# Altium PCB Electrode_Ribbon_PCB_v3.1.PcbDoc (part 4 of 5)
Units mil, origin at the board's own origin, x right, y up, seen from the top; angles counter-clockwise.
Board outline 8303.83 x 5482.84 mil, 2 copper layers (Top Layer, Bottom Layer), stack 3.556 mil thick; 265 components, 171 nets, 720 pads, 346 vias.
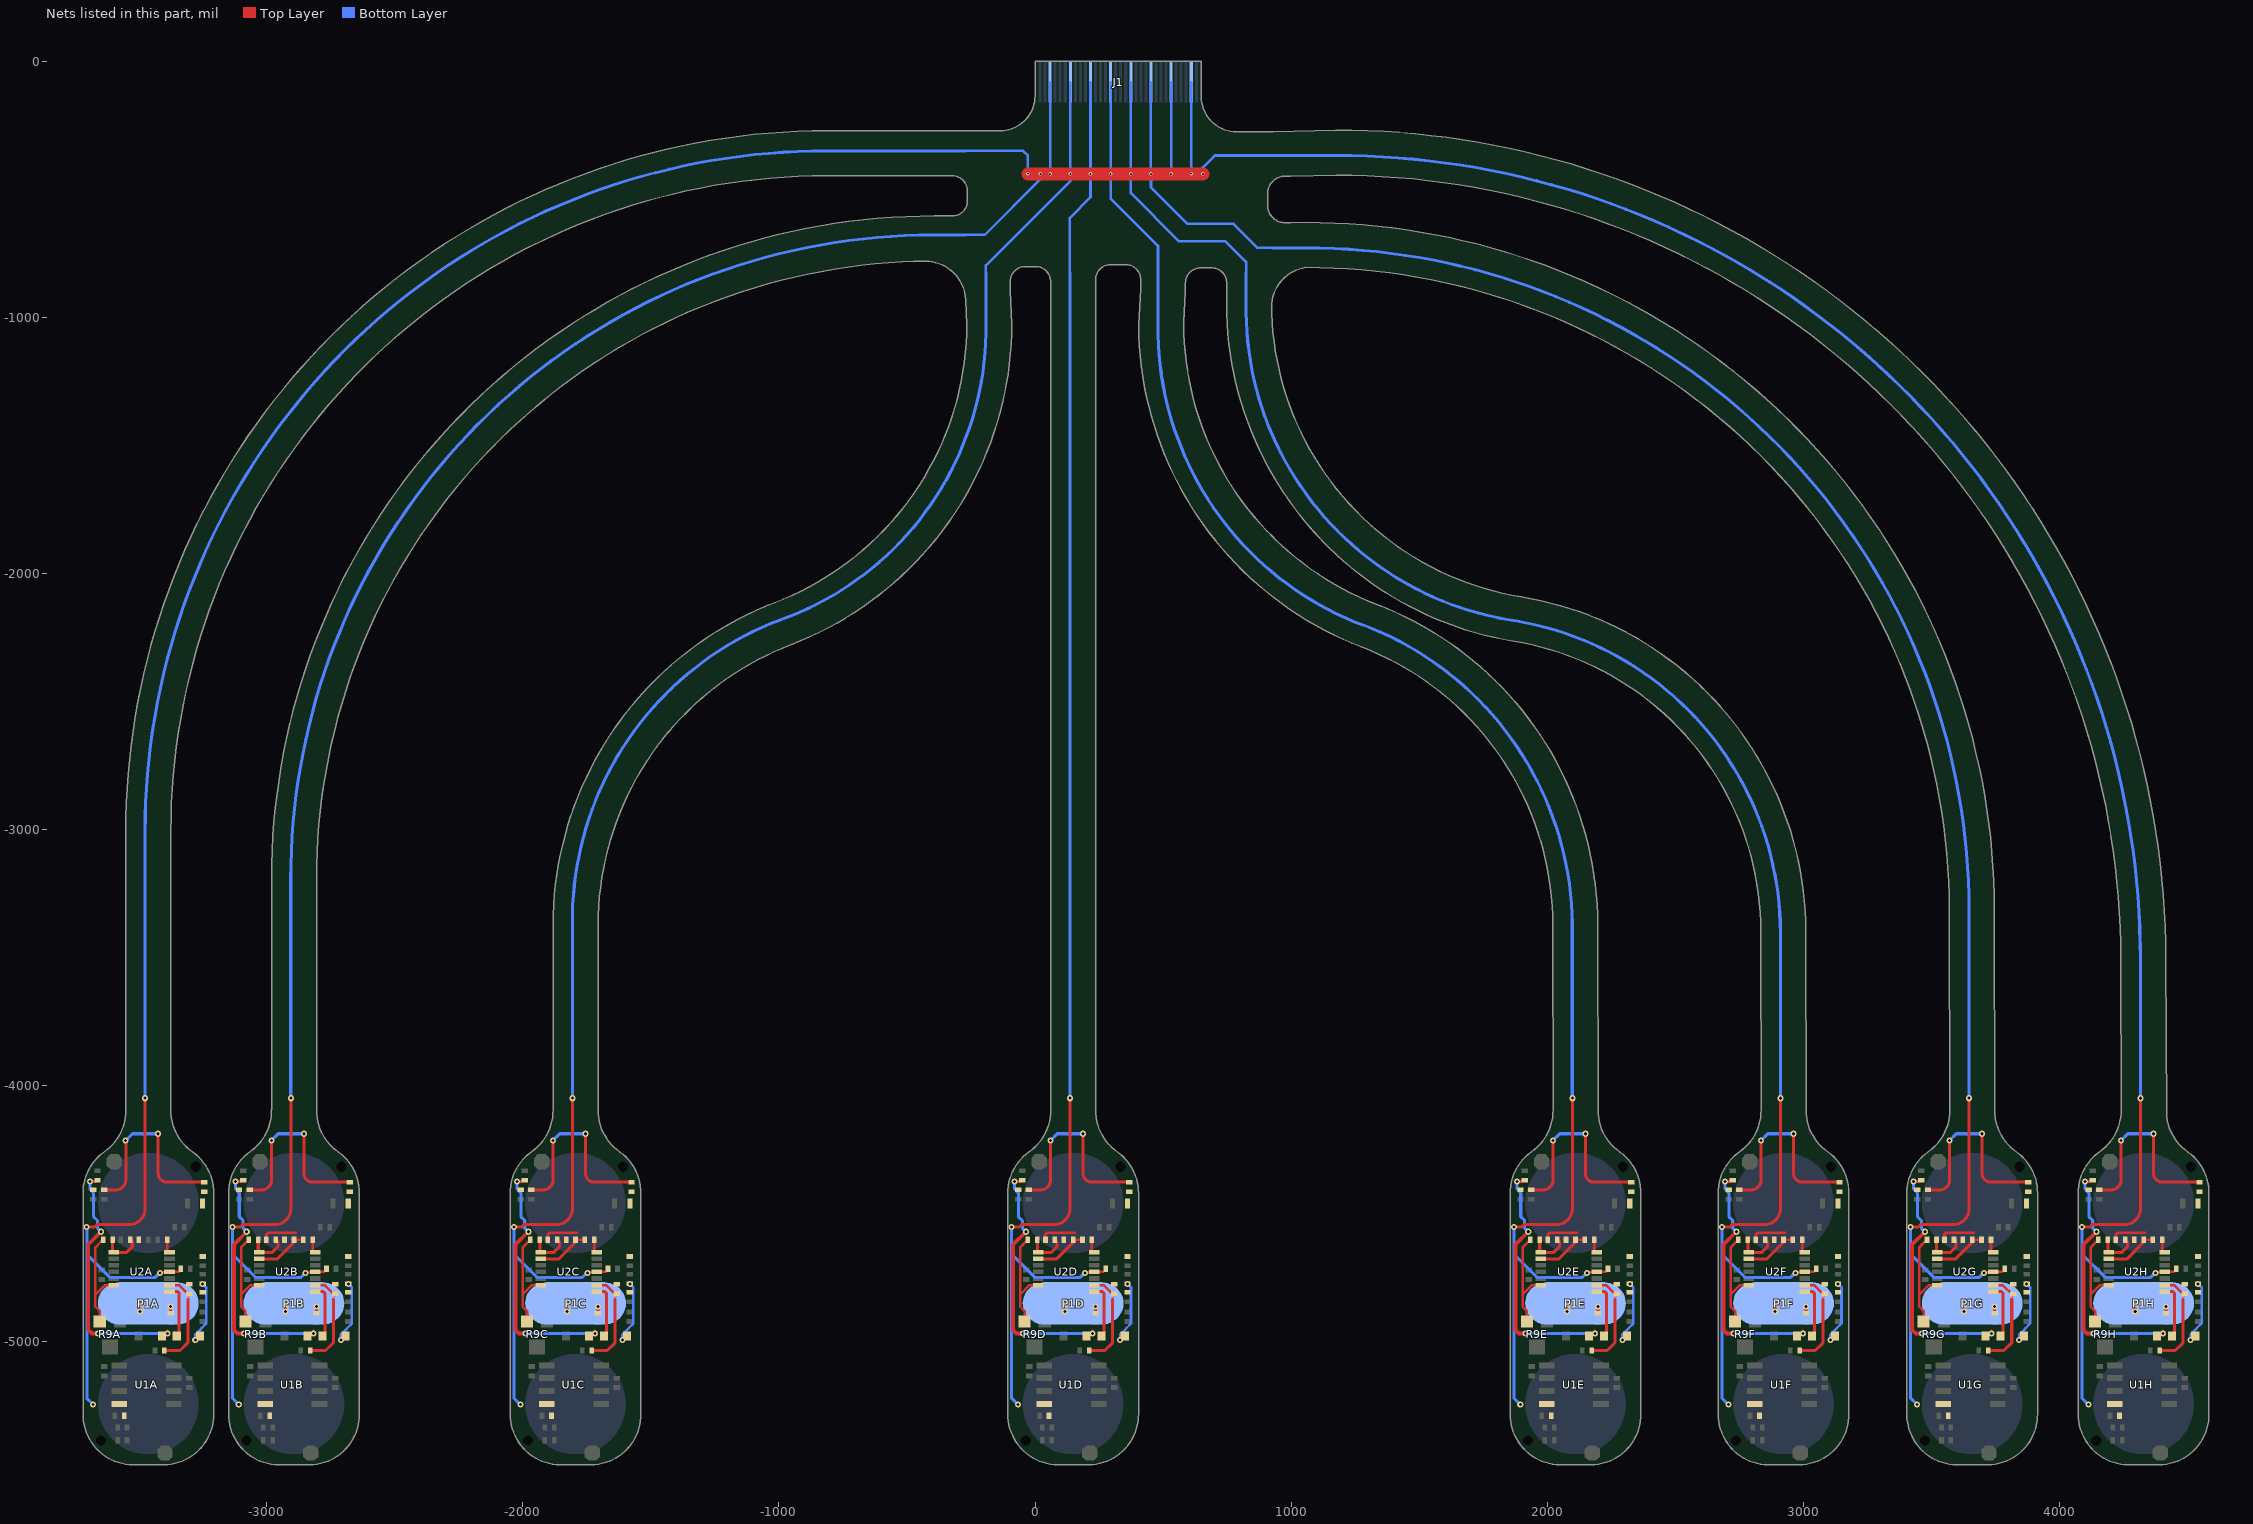
[diagram p3: the nets of this part, all layers, seen from the top]

## Via types
v1: diameter 23.62, hole 11.81, Top Layer to Bottom Layer, tented both sides, 304 vias
v2: diameter 13.78, hole 7.87, Top Layer to Bottom Layer, 42 vias

## Nets (pads, with @x,y where several pads share a name; then routed paths per layer and width w, separated by ;. In a path a pad name is that pad's centre, name@x,y a point inside that pad or via, vN(x,y) a via of type N, cw(c..) or ccw(c..) an arc to the next point about the centre after c; other vN are vias at no path point) (continued)
NetC4B_2: C4B.2 R7B.1 R8B.1 U2B.9 | length 353.4
  Top Layer w10: C4B.2@-2998.4,-4599.78 C4B.2@-3002.4,-4603.78 -3002.4,-4582.64 -2996.54,-4576.78 -2887.9,-4576.78 ; R7B.1@-2897.9,-4608.28 R7B.1@-2894.4,-4604.78 R7B.1@-2894.4,-4614.26 ; R7B.1@-2890.9,-4611.78 -2883.9,-4604.78 R8B.1@-2861.9,-4604.78
  Top Layer w12: U2B.9@-3031.13,-4678.6 -2958.74,-4678.6 R7B.1@-2894.4,-4614.26
NetC4C_2: C4C.2 R7C.1 R8C.1 U2C.9 | length 353.4
  Top Layer w10: C4C.2@-1898.61,-4599.78 C4C.2@-1902.61,-4603.78 -1902.61,-4582.64 -1896.76,-4576.78 -1788.11,-4576.78 ; R7C.1@-1798.11,-4608.28 R7C.1@-1794.61,-4604.78 R7C.1@-1794.61,-4614.26 ; R7C.1@-1791.11,-4611.78 -1784.11,-4604.78 R8C.1@-1762.11,-4604.78
  Top Layer w12: U2C.9@-1931.35,-4678.6 -1858.95,-4678.6 R7C.1@-1794.61,-4614.26
NetC4D_2: C4D.2 R7D.1 R8D.1 U2D.9 | length 353.4
  Top Layer w10: C4D.2@44.87,-4599.78 C4D.2@40.87,-4603.78 40.87,-4582.64 46.73,-4576.78 155.37,-4576.78 ; R7D.1@145.37,-4608.28 R7D.1@148.87,-4604.78 R7D.1@148.87,-4614.26 ; R7D.1@152.37,-4611.78 159.37,-4604.78 R8D.1@181.37,-4604.78
  Top Layer w12: U2D.9@12.13,-4678.6 84.53,-4678.6 R7D.1@148.87,-4614.26
NetC4E_2: C4E.2 R7E.1 R8E.1 U2E.9 | length 353.4
  Top Layer w10: C4E.2@2007.04,-4599.78 C4E.2@2003.04,-4603.78 2003.04,-4582.64 2008.89,-4576.78 2117.54,-4576.78 ; R7E.1@2107.54,-4608.28 R7E.1@2111.04,-4604.78 R7E.1@2111.04,-4614.26 ; R7E.1@2114.54,-4611.78 2121.54,-4604.78 R8E.1@2143.54,-4604.78
  Top Layer w12: U2E.9@1974.3,-4678.6 2046.7,-4678.6 R7E.1@2111.04,-4614.26
NetC4F_2: C4F.2 R7F.1 R8F.1 U2F.9 | length 353.4
  Top Layer w10: C4F.2@2819.75,-4599.79 C4F.2@2815.75,-4603.79 2815.75,-4582.65 2821.61,-4576.79 2930.25,-4576.79 ; R7F.1@2920.25,-4608.29 R7F.1@2923.75,-4604.79 R7F.1@2923.75,-4614.27 ; R7F.1@2927.25,-4611.79 2934.25,-4604.79 R8F.1@2956.25,-4604.79
  Top Layer w12: U2F.9@2787.01,-4678.61 2859.41,-4678.61 R7F.1@2923.75,-4614.27
NetC4G_2: C4G.2 R7G.1 R8G.1 U2G.9 | length 353.4
  Top Layer w10: C4G.2@3556.5,-4599.78 C4G.2@3552.5,-4603.78 3552.5,-4582.64 3558.36,-4576.78 3667,-4576.78 ; R7G.1@3657,-4608.28 R7G.1@3660.5,-4604.78 R7G.1@3660.5,-4614.26 ; R7G.1@3664,-4611.78 3671,-4604.78 R8G.1@3693,-4604.78
  Top Layer w12: U2G.9@3523.76,-4678.6 3596.16,-4678.6 R7G.1@3660.5,-4614.26
NetC4H_2: C4H.2 R7H.1 R8H.1 U2H.9 | length 353.4
  Top Layer w10: C4H.2@4225.97,-4599.78 C4H.2@4221.97,-4603.78 4221.97,-4582.64 4227.83,-4576.78 4336.47,-4576.78 ; R7H.1@4326.47,-4608.28 R7H.1@4329.97,-4604.78 R7H.1@4329.97,-4614.26 ; R7H.1@4333.47,-4611.78 4340.47,-4604.78 R8H.1@4362.47,-4604.78
  Top Layer w12: U2H.9@4193.24,-4678.6 4265.63,-4678.6 R7H.1@4329.97,-4614.26
NetD1A_2: D1A.2 R2A.2 R3A.2 | length 268.4
  Top Layer w10: v1(-3279.89,-4995.78) -3277.61,-4993.5 -3272.37,-4993.5 -3261.62,-4982.75 D1A.2@-3261.62,-4980.78
  Bottom Layer w10: v1(-3279.89,-4995.78) -3279.89,-4974.16 -3255.81,-4950.08 -3255.81,-4949.7 -3237.26,-4931.15 -3237.26,-4789.9 v1(-3250.87,-4776.28)
NetD1B_2: D1B.2 R2B.2 R3B.2 | length 268.4
  Top Layer w10: v1(-2710.92,-4995.78) -2708.63,-4993.5 -2703.39,-4993.5 -2692.64,-4982.75 D1B.2@-2692.64,-4980.78
  Bottom Layer w10: v1(-2710.92,-4995.78) -2710.92,-4974.16 -2686.84,-4950.08 -2686.84,-4949.7 -2668.28,-4931.15 -2668.28,-4789.9 v1(-2681.9,-4776.28)
NetD1C_2: D1C.2 R2C.2 R3C.2 | length 268.4
  Top Layer w10: v1(-1611.13,-4995.78) -1608.85,-4993.5 -1603.61,-4993.5 -1592.86,-4982.75 D1C.2@-1592.86,-4980.78
  Bottom Layer w10: v1(-1611.13,-4995.78) -1611.13,-4974.16 -1587.05,-4950.08 -1587.05,-4949.7 -1568.58,-4931.23 -1568.58,-4789.82 v1(-1582.11,-4776.28)
NetD1D_2: D1D.2 R2D.2 R3D.2 | length 268.4
  Top Layer w10: v1(332.35,-4995.78) 334.63,-4993.5 339.88,-4993.5 350.63,-4982.75 D1D.2@350.63,-4980.78
  Bottom Layer w10: v1(332.35,-4995.78) 332.35,-4974.16 356.43,-4950.08 356.43,-4949.7 374.99,-4931.15 374.99,-4789.9 v1(361.37,-4776.28)
NetD1E_2: D1E.2 R2E.2 R3E.2 | length 268.7
  Top Layer w10: v1(2294.52,-4995.78) 2296.8,-4993.5 2302.04,-4993.5 2312.79,-4982.75 D1E.2@2312.79,-4980.78
  Bottom Layer w10: v1(2294.52,-4995.78) 2294.52,-4974.16 2318.6,-4950.08 2318.6,-4949.7 2337.47,-4930.83 2337.47,-4790.22 v1(2323.54,-4776.28)
NetD1F_2: D1F.2 R2F.2 R3F.2 | length 268.7
  Top Layer w10: v1(3107.23,-4995.79) 3109.51,-4993.51 3114.76,-4993.51 3125.5,-4982.76 D1F.2@3125.5,-4980.79
  Bottom Layer w10: v1(3107.23,-4995.79) 3107.23,-4974.16 3131.31,-4950.08 3131.31,-4949.71 3150.18,-4930.83 3150.18,-4790.23 v1(3136.25,-4776.29)
NetD1G_2: D1G.2 R2G.2 R3G.2 | length 268.7
  Top Layer w10: v1(3843.98,-4995.78) 3846.26,-4993.5 3851.5,-4993.5 3862.25,-4982.75 D1G.2@3862.25,-4980.78
  Bottom Layer w10: v1(3843.98,-4995.78) 3843.98,-4974.16 3868.06,-4950.08 3868.06,-4949.7 3886.93,-4930.83 3886.93,-4790.22 v1(3873,-4776.28)
NetD1H_2: D1H.2 R2H.2 R3H.2 | length 268.7
  Top Layer w10: v1(4513.45,-4995.78) 4515.74,-4993.5 4520.98,-4993.5 4531.73,-4982.75 D1H.2@4531.73,-4980.78
  Bottom Layer w10: v1(4513.45,-4995.78) 4513.45,-4974.16 4537.53,-4950.08 4537.53,-4949.7 4556.41,-4930.83 4556.41,-4790.22 v1(4542.47,-4776.28)
NetLED1A_2: LED1A.2 R11A.2
NetLED1B_2: LED1B.2 R11B.2
NetLED1C_2: LED1C.2 R11C.2
NetLED1D_2: LED1D.2 R11D.2
NetLED1E_2: LED1E.2 R11E.2
NetLED1F_2: LED1F.2 R11F.2
NetLED1G_2: LED1G.2 R11G.2
NetLED1H_2: LED1H.2 R11H.2
NetP1A_3: P1A.3 SB3A.1 SB4A.1 | length 53
  Top Layer w12: v1(-3495.89,-4884.78) SB4A.1@-3495.89,-4858.28 ; SB3A.1@-3375.89,-4891.28 v1(-3375.89,-4864.78)
NetP1B_3: P1B.3 SB3B.1 SB4B.1 | length 53
  Top Layer w12: v1(-2926.92,-4884.78) SB4B.1@-2926.92,-4858.28 ; SB3B.1@-2806.92,-4891.28 v1(-2806.92,-4864.78)
NetP1C_3: P1C.3 SB3C.1 SB4C.1 | length 53
  Top Layer w12: v1(-1827.13,-4884.78) SB4C.1@-1827.13,-4858.28 ; SB3C.1@-1707.13,-4891.28 v1(-1707.13,-4864.78)
NetP1D_3: P1D.3 SB3D.1 SB4D.1 | length 53
  Top Layer w12: v1(116.35,-4884.78) SB4D.1@116.35,-4858.28 ; SB3D.1@236.35,-4891.28 v1(236.35,-4864.78)
NetP1E_3: P1E.3 SB3E.1 SB4E.1 | length 53
  Top Layer w12: v1(2078.52,-4884.78) SB4E.1@2078.52,-4858.28 ; SB3E.1@2198.52,-4891.28 v1(2198.52,-4864.78)
NetP1F_3: P1F.3 SB3F.1 SB4F.1 | length 53
  Top Layer w12: v1(2891.23,-4884.79) SB4F.1@2891.23,-4858.29 ; SB3F.1@3011.23,-4891.29 v1(3011.23,-4864.79)
NetP1G_3: P1G.3 SB3G.1 SB4G.1 | length 53
  Top Layer w12: v1(3627.98,-4884.78) SB4G.1@3627.98,-4858.28 ; SB3G.1@3747.98,-4891.28 v1(3747.98,-4864.78)
NetP1H_3: P1H.3 SB3H.1 SB4H.1 | length 53
  Top Layer w12: v1(4297.45,-4884.78) SB4H.1@4297.45,-4858.28 ; SB3H.1@4417.45,-4891.28 v1(4417.45,-4864.78)
NetR3A_1: R3A.1 R4A.1 R5A.1 U2A.2 | length 366.6
  Top Layer w10: U2A.2@-3380.62,-4780.97 U2A.2@-3379.64,-4780.97 ; U2A.2@-3379.55,-4780.87 U2A.2@-3379.64,-4780.97 ; R3A.1@-3304.81,-4820.23 -3344.07,-4780.97 U2A.2@-3379.64,-4780.97
  Top Layer w12: R5A.1@-3400.39,-5036.78 -3339.87,-5036.78 -3308.87,-5005.78 -3308.87,-4835.78
NetR3B_1: R3B.1 R4B.1 R5B.1 U2B.2 | length 366.6
  Top Layer w10: U2B.2@-2811.64,-4780.96 U2B.2@-2810.66,-4780.96 ; U2B.2@-2810.57,-4780.87 U2B.2@-2810.66,-4780.96 ; R3B.1@-2735.84,-4820.22 -2775.1,-4780.96 U2B.2@-2810.66,-4780.96
  Top Layer w12: R5B.1@-2831.42,-5036.78 -2770.9,-5036.78 -2739.9,-5005.78 -2739.9,-4835.78
NetR3C_1: R3C.1 R4C.1 R5C.1 U2C.2 | length 366.6
  Top Layer w10: U2C.2@-1711.86,-4780.97 U2C.2@-1710.88,-4780.97 ; U2C.2@-1710.79,-4780.87 U2C.2@-1710.88,-4780.97 ; R3C.1@-1636.05,-4820.23 -1675.31,-4780.97 U2C.2@-1710.88,-4780.97
  Top Layer w12: R5C.1@-1731.63,-5036.78 -1671.11,-5036.78 -1640.11,-5005.78 -1640.11,-4835.78
NetR3D_1: R3D.1 R4D.1 R5D.1 U2D.2 | length 366.6
  Top Layer w10: U2D.2@231.62,-4780.96 U2D.2@232.61,-4780.96 ; U2D.2@232.7,-4780.87 U2D.2@232.61,-4780.96 ; R3D.1@307.43,-4820.22 268.17,-4780.96 U2D.2@232.61,-4780.96
  Top Layer w12: R5D.1@211.85,-5036.78 272.37,-5036.78 303.37,-5005.78 303.37,-4835.78
NetR3E_1: R3E.1 R4E.1 R5E.1 U2E.2 | length 366.6
  Top Layer w10: U2E.2@2193.79,-4780.97 U2E.2@2194.77,-4780.97 ; U2E.2@2194.86,-4780.87 U2E.2@2194.77,-4780.97 ; R3E.1@2269.59,-4820.23 2230.33,-4780.97 U2E.2@2194.77,-4780.97
  Top Layer w12: R5E.1@2174.02,-5036.78 2234.54,-5036.78 2265.54,-5005.78 2265.54,-4835.78
NetR3F_1: R3F.1 R4F.1 R5F.1 U2F.2 | length 366.6
  Top Layer w10: U2F.2@3006.5,-4780.97 U2F.2@3007.48,-4780.97 ; U2F.2@3007.57,-4780.88 U2F.2@3007.48,-4780.97 ; R3F.1@3082.31,-4820.23 3043.05,-4780.97 U2F.2@3007.48,-4780.97
  Top Layer w12: R5F.1@2986.73,-5036.79 3047.25,-5036.79 3078.25,-5005.79 3078.25,-4835.79
NetR3G_1: R3G.1 R4G.1 R5G.1 U2G.2 | length 366.6
  Top Layer w10: U2G.2@3743.25,-4780.96 U2G.2@3744.23,-4780.96 ; U2G.2@3744.32,-4780.87 U2G.2@3744.23,-4780.96 ; R3G.1@3819.06,-4820.22 3779.8,-4780.96 U2G.2@3744.23,-4780.96
  Top Layer w12: R5G.1@3723.48,-5036.78 3784,-5036.78 3815,-5005.78 3815,-4835.78
NetR3H_1: R3H.1 R4H.1 R5H.1 U2H.2 | length 366.6
  Top Layer w10: U2H.2@4412.72,-4780.97 U2H.2@4413.71,-4780.97 ; U2H.2@4413.8,-4780.88 U2H.2@4413.71,-4780.97 ; R3H.1@4488.53,-4820.23 4449.27,-4780.97 U2H.2@4413.71,-4780.97
  Top Layer w12: R5H.1@4392.95,-5036.78 4453.47,-5036.78 4484.47,-5005.78 4484.47,-4835.78
NetR9A_3: R9A.3 R10A.1 U2A.13 | length 423.5
  Top Layer w10: R9A.3@-3652.89,-4922.78 -3652.89,-4882.76 -3669.87,-4865.78 -3669.87,-4817.76 ; R10A.1@-3639.89,-4603.78 -3660.89,-4624.78 -3669.87,-4633.76 -3669.87,-4817.76 ; U2A.13@-3600.11,-4780.97 -3633.07,-4780.97 -3669.87,-4817.76
NetR9B_3: R9B.3 R10B.1 U2B.13 | length 423.5
  Top Layer w10: R9B.3@-3083.92,-4922.78 -3083.92,-4882.76 -3100.9,-4865.78 -3100.9,-4817.76 ; R10B.1@-3070.92,-4603.78 -3091.92,-4624.78 -3100.9,-4633.76 -3100.9,-4817.76 ; U2B.13@-3031.13,-4780.96 -3064.1,-4780.96 -3100.9,-4817.76
NetR9C_3: R9C.3 R10C.1 U2C.13 | length 423.5
  Top Layer w10: R9C.3@-1984.13,-4922.78 -1984.13,-4882.76 -2001.11,-4865.78 -2001.11,-4817.76 ; R10C.1@-1971.13,-4603.78 -1992.13,-4624.78 -2001.11,-4633.76 -2001.11,-4817.76 ; U2C.13@-1931.35,-4780.97 -1964.31,-4780.97 -2001.11,-4817.76
NetR9D_3: R9D.3 R10D.1 U2D.13 | length 423.5
  Top Layer w10: R9D.3@-40.65,-4922.78 -40.65,-4882.76 -57.63,-4865.78 -57.63,-4817.76 ; R10D.1@-27.65,-4603.78 -48.65,-4624.78 -57.63,-4633.76 -57.63,-4817.76 ; U2D.13@12.13,-4780.96 -20.83,-4780.96 -57.63,-4817.76
NetR9E_3: R9E.3 R10E.1 U2E.13 | length 423.5
  Top Layer w10: R9E.3@1921.52,-4922.78 1921.52,-4882.76 1904.54,-4865.78 1904.54,-4817.76 ; R10E.1@1934.52,-4603.78 1913.52,-4624.78 1904.54,-4633.76 1904.54,-4817.76 ; U2E.13@1974.3,-4780.97 1941.33,-4780.97 1904.54,-4817.76
NetR9F_3: R9F.3 R10F.1 U2F.13 | length 423.5
  Top Layer w10: R9F.3@2734.23,-4922.79 2734.23,-4882.77 2717.25,-4865.79 2717.25,-4817.77 ; R10F.1@2747.23,-4603.79 2726.23,-4624.79 2717.25,-4633.77 2717.25,-4817.77 ; U2F.13@2787.01,-4780.97 2754.05,-4780.97 2717.25,-4817.77
NetR9G_3: R9G.3 R10G.1 U2G.13 | length 423.5
  Top Layer w10: R9G.3@3470.98,-4922.78 3470.98,-4882.76 3454,-4865.78 3454,-4817.76 ; R10G.1@3483.98,-4603.78 3462.98,-4624.78 3454,-4633.76 3454,-4817.76 ; U2G.13@3523.76,-4780.96 3490.8,-4780.96 3454,-4817.76
NetR9H_3: R9H.3 R10H.1 U2H.13 | length 423.5
  Top Layer w10: R9H.3@4140.45,-4922.78 4140.45,-4882.76 4123.47,-4865.78 4123.47,-4817.76 ; R10H.1@4153.45,-4603.78 4132.45,-4624.78 4123.47,-4633.76 4123.47,-4817.76 ; U2H.13@4193.24,-4780.97 4160.27,-4780.97 4123.47,-4817.76
NetR11A_1: R11A.1 SB1A.2 SB2A.2 | length 753.3
  Top Layer w12: SB1A.2@-3635.89,-4409.28 -3590.3,-4409.28 ccw(c-3590.3,-4370.11) -3551.13,-4370.11 -3551.13,-4217.08 v1(-3551.8,-4216.41) ; v1(-3424.87,-4190) -3424.88,-4344.4 ccw(c-3390,-4344.4) -3390,-4379.28 R11A.1@-3244.89,-4379.28
  Bottom Layer w12: v1(-3551.8,-4216.41) -3525.39,-4190 v1(-3424.87,-4190)
NetR11B_1: R11B.1 SB1B.2 SB2B.2 | length 753.3
  Top Layer w12: SB1B.2@-3066.92,-4409.28 -3021.32,-4409.28 ccw(c-3021.32,-4370.11) -2982.15,-4370.11 -2982.15,-4217.08 v1(-2982.82,-4216.41) ; v1(-2855.89,-4190) -2855.9,-4344.4 ccw(c-2821.02,-4344.4) -2821.02,-4379.28 R11B.1@-2675.92,-4379.28
  Bottom Layer w12: v1(-2982.82,-4216.41) -2956.41,-4190 v1(-2855.89,-4190)
NetR11C_1: R11C.1 SB1C.2 SB2C.2 | length 753.3
  Top Layer w12: SB1C.2@-1967.13,-4409.28 -1921.54,-4409.28 ccw(c-1921.54,-4370.11) -1882.37,-4370.11 -1882.37,-4217.08 v1(-1883.04,-4216.41) ; v1(-1756.11,-4190) -1756.12,-4344.4 ccw(c-1721.24,-4344.4) -1721.24,-4379.28 R11C.1@-1576.13,-4379.28
  Bottom Layer w12: v1(-1883.04,-4216.41) -1856.63,-4190 v1(-1756.11,-4190)
NetR11D_1: R11D.1 SB1D.2 SB2D.2 | length 753.3
  Top Layer w12: SB1D.2@-23.65,-4409.28 21.94,-4409.28 ccw(c21.94,-4370.11) 61.12,-4370.11 61.12,-4217.08 v1(60.45,-4216.41) ; v1@187.36,-4190.01 187.36,-4344.4 ccw(c222.24,-4344.4) 222.24,-4379.28 R11D.1@367.35,-4379.28
  Bottom Layer w12: v1(60.45,-4216.41) 86.86,-4190 v1(187.37,-4190)
NetR11E_1: R11E.1 SB1E.2 SB2E.2 | length 753.2
  Top Layer w12: SB1E.2@1938.52,-4409.28 1984.11,-4409.28 ccw(c1984.11,-4370.11) 2023.28,-4370.11 2023.28,-4217.08 v1(2022.61,-4216.41) ; v1(2149.51,-4190) 2149.53,-4344.4 ccw(c2184.41,-4344.4) 2184.41,-4379.28 R11E.1@2329.52,-4379.28
  Bottom Layer w12: v1(2022.61,-4216.41) 2049.02,-4190 v1(2149.51,-4190)
NetR11F_1: R11F.1 SB1F.2 SB2F.2 | length 753.3
  Top Layer w12: SB1F.2@2751.23,-4409.29 2796.82,-4409.29 ccw(c2796.82,-4370.12) 2835.99,-4370.12 2835.99,-4217.09 v1(2835.32,-4216.42) ; v1@2962.24,-4190.01 2962.24,-4344.41 ccw(c2997.12,-4344.41) 2997.12,-4379.29 R11F.1@3142.23,-4379.29
  Bottom Layer w12: v1(2835.32,-4216.42) 2861.74,-4190.01 v1(2962.25,-4190.01)
NetR11G_1: R11G.1 SB1G.2 SB2G.2 | length 753.3
  Top Layer w12: SB1G.2@3487.98,-4409.28 3533.57,-4409.28 ccw(c3533.57,-4370.11) 3572.74,-4370.11 3572.74,-4217.08 v1(3572.07,-4216.41) ; v1(3699,-4190) 3698.99,-4344.4 ccw(c3733.87,-4344.4) 3733.87,-4379.28 R11G.1@3878.98,-4379.28
  Bottom Layer w12: v1(3572.07,-4216.41) 3598.48,-4190 v1(3699,-4190)
NetR11H_1: R11H.1 SB1H.2 SB2H.2 | length 753.3
  Top Layer w12: SB1H.2@4157.45,-4409.28 4203.05,-4409.28 ccw(c4203.05,-4370.11) 4242.22,-4370.11 4242.22,-4217.08 v1(4241.55,-4216.41) ; v1@4368.47,-4190.01 4368.47,-4344.4 ccw(c4403.34,-4344.4) 4403.34,-4379.28 R11H.1@4548.45,-4379.28
  Bottom Layer w12: v1(4241.55,-4216.41) 4267.96,-4190 v1(4368.48,-4190)
OUT1A: D1A.1 D2A.2 SB7A.1 U2A.1 | length 1189.4
  Top Layer w10: D1A.1@-3352.17,-4980.78 D1A.1@-3342.89,-4971.51
  Top Layer w12: v1(-3691.89,-4375.97) -3673.21,-4375.97 ccw(c-3673.21,-4359.96) SB7A.1@-3661.89,-4371.28 ; v1@-3390.89,-4967.78 -3387.89,-4967.78 v1@-3387.89,-4960.78 ; U2A.1@-3380.62,-4806.56 -3348.75,-4806.56 -3342.89,-4812.41 D1A.1@-3342.89,-4971.51
  Top Layer w15: v1(-3658.89,-4970.78) -3683.89,-4970.78 -3697.89,-4956.78 -3697.89,-4622.78 v1(-3647.89,-4572.78)
  Bottom Layer w12: v1(-3691.89,-4375.97) -3691.89,-4405.78 -3677.08,-4420.6 -3677.08,-4513.6 -3661.89,-4528.78 -3661.89,-4558.78 v1(-3647.89,-4572.78) ; v1(-3658.89,-4970.78) v1(-3387.89,-4970.78) v1@-3387.65,-4970.78
OUT1B: D1B.1 D2B.2 SB7B.1 U2B.1 | length 1189.4
  Top Layer w10: D1B.1@-2783.19,-4980.78 D1B.1@-2773.92,-4971.51
  Top Layer w12: v1(-3122.92,-4375.97) -3104.24,-4375.97 ccw(c-3104.24,-4359.96) SB7B.1@-3092.93,-4371.3 ; v1@-2821.92,-4967.78 -2818.92,-4967.78 v1@-2818.92,-4960.78 ; U2B.1@-2811.64,-4806.56 -2779.77,-4806.56 -2773.92,-4812.41 D1B.1@-2773.92,-4971.51
  Top Layer w15: v1(-3089.92,-4970.78) -3114.92,-4970.78 -3128.92,-4956.78 -3128.92,-4622.78 v1(-3078.92,-4572.78)
  Bottom Layer w12: v1(-3122.92,-4375.97) -3122.92,-4405.78 -3108.11,-4420.59 -3108.11,-4513.59 -3092.92,-4528.78 -3092.92,-4558.78 v1(-3078.92,-4572.78) ; v1(-3089.92,-4970.78) v1(-2818.92,-4970.78) v1@-2818.68,-4970.78
OUT1C: D1C.1 D2C.2 SB7C.1 U2C.1 | length 1189.4
  Top Layer w10: D1C.1@-1683.41,-4980.78 D1C.1@-1674.13,-4971.51
  Top Layer w12: v1(-2023.13,-4375.97) -2004.45,-4375.97 ccw(c-2004.45,-4359.96) SB7C.1@-1993.13,-4371.28 ; v1@-1722.13,-4967.78 -1719.13,-4967.78 v1@-1719.13,-4960.78 ; U2C.1@-1711.86,-4806.56 -1679.99,-4806.56 -1674.13,-4812.41 D1C.1@-1674.13,-4971.51
  Top Layer w15: v1(-1990.13,-4970.78) -2015.13,-4970.78 -2029.13,-4956.78 -2029.13,-4622.78 v1(-1979.13,-4572.78)
  Bottom Layer w12: v1(-2023.13,-4375.97) -2023.13,-4405.78 -2008.32,-4420.6 -2008.32,-4513.6 -1993.13,-4528.78 -1993.13,-4558.78 v1(-1979.13,-4572.78) ; v1(-1990.13,-4970.78) v1(-1719.13,-4970.78) v1@-1718.89,-4970.78
OUT1D: D1D.1 D2D.2 SB7D.1 U2D.1 | length 1189.4
  Top Layer w10: D1D.1@260.08,-4980.78 D1D.1@269.35,-4971.51
  Top Layer w12: v1(-79.65,-4375.97) -60.97,-4375.97 ccw(c-60.97,-4359.96) SB7D.1@-49.65,-4371.28 ; v1@221.35,-4967.78 224.35,-4967.78 v1@224.35,-4960.78 ; U2D.1@231.62,-4806.55 263.49,-4806.55 269.35,-4812.41 D1D.1@269.35,-4971.51
  Top Layer w15: v1(-46.65,-4970.78) -71.65,-4970.78 -85.65,-4956.78 -85.65,-4622.78 v1(-35.65,-4572.78)
  Bottom Layer w12: v1(-79.65,-4375.97) -79.65,-4405.78 -64.84,-4420.59 -64.84,-4513.59 -49.65,-4528.78 -49.65,-4558.78 v1(-35.65,-4572.78) ; v1(-46.65,-4970.78) v1(224.35,-4970.78) v1@224.59,-4970.78
OUT1E: D1E.1 D2E.2 SB7E.1 U2E.1 | length 1189.4
  Top Layer w10: D1E.1@2222.24,-4980.78 D1E.1@2231.52,-4971.51
  Top Layer w12: v1(1882.52,-4375.97) 1901.2,-4375.97 ccw(c1901.2,-4359.96) SB7E.1@1912.52,-4371.28 ; v1@2183.52,-4967.78 2186.52,-4967.78 v1@2186.52,-4960.78 ; U2E.1@2193.79,-4806.56 2225.66,-4806.56 2231.52,-4812.41 D1E.1@2231.52,-4971.51
  Top Layer w15: v1(1915.52,-4970.78) 1890.52,-4970.78 1876.52,-4956.78 1876.52,-4622.78 v1(1926.52,-4572.78)
  Bottom Layer w12: v1(1882.52,-4375.97) 1882.52,-4405.78 1897.33,-4420.59 1897.33,-4513.59 1912.52,-4528.78 1912.52,-4558.78 v1(1926.52,-4572.78) ; v1(1915.52,-4970.78) v1(2186.52,-4970.78) v1@2186.75,-4970.78
OUT1F: D1F.1 D2F.2 SB7F.1 U2F.1 | length 1189.4
  Top Layer w10: D1F.1@3034.95,-4980.79 D1F.1@3044.23,-4971.51
  Top Layer w12: v1(2695.23,-4375.98) 2713.91,-4375.98 ccw(c2713.91,-4359.97) SB7F.1@2725.23,-4371.29 ; v1@2996.23,-4967.79 2999.23,-4967.79 v1@2999.23,-4960.79 ; U2F.1@3006.5,-4806.56 3038.37,-4806.56 3044.23,-4812.42 D1F.1@3044.23,-4971.51
  Top Layer w15: v1(2728.23,-4970.79) 2703.23,-4970.79 2689.23,-4956.79 2689.23,-4622.79 v1(2739.23,-4572.79)
  Bottom Layer w12: v1(2695.23,-4375.98) 2695.23,-4405.79 2710.04,-4420.6 2710.04,-4513.6 2725.23,-4528.79 2725.23,-4558.79 v1(2739.23,-4572.79) ; v1(2728.23,-4970.79) v1(2999.23,-4970.79) v1@2999.47,-4970.79
OUT1G: D1G.1 D2G.2 SB7G.1 U2G.1 | length 1189.4
  Top Layer w10: D1G.1@3771.7,-4980.78 D1G.1@3780.98,-4971.51
  Top Layer w12: v1(3431.98,-4375.97) 3450.66,-4375.97 ccw(c3450.66,-4359.96) SB7G.1@3461.96,-4371.3 ; v1@3732.98,-4967.78 3735.98,-4967.78 v1@3735.98,-4960.78 ; U2G.1@3743.25,-4806.56 3775.12,-4806.56 3780.98,-4812.41 D1G.1@3780.98,-4971.51
  Top Layer w15: v1(3464.98,-4970.78) 3439.98,-4970.78 3425.98,-4956.78 3425.98,-4622.78 v1(3475.98,-4572.78)
  Bottom Layer w12: v1(3431.98,-4375.97) 3431.98,-4405.78 3446.79,-4420.59 3446.79,-4513.59 3461.98,-4528.78 3461.98,-4558.78 v1(3475.98,-4572.78) ; v1(3464.98,-4970.78) v1(3735.98,-4970.78) v1@3736.22,-4970.78
OUT1H: D1H.1 D2H.2 SB7H.1 U2H.1 | length 1189.4
  Top Layer w10: D1H.1@4441.18,-4980.78 D1H.1@4450.45,-4971.51
  Top Layer w12: v1(4101.45,-4375.97) 4120.13,-4375.97 ccw(c4120.13,-4359.96) SB7H.1@4131.45,-4371.28 ; v1@4402.45,-4967.78 4405.45,-4967.78 v1@4405.45,-4960.78 ; U2H.1@4412.72,-4806.56 4444.59,-4806.56 4450.45,-4812.41 D1H.1@4450.45,-4971.51
  Top Layer w15: v1(4134.45,-4970.78) 4109.45,-4970.78 4095.45,-4956.78 4095.45,-4622.78 v1(4145.45,-4572.78)
  Bottom Layer w12: v1(4101.45,-4375.97) 4101.45,-4405.78 4116.26,-4420.6 4116.26,-4513.6 4131.45,-4528.78 4131.45,-4558.78 v1(4145.45,-4572.78) ; v1(4134.45,-4970.78) v1(4405.45,-4970.78) v1@4405.69,-4970.78
RECTA: R6A.2 R8A.2 U2A.7 | length 53.8
  Top Layer w10: R8A.2@-3389.87,-4604.78 -3389.87,-4646.78 -3383.64,-4653.01 U2A.7@-3380.62,-4653.01
RECTB: R6B.2 R8B.2 U2B.7 | length 53.8
  Top Layer w10: R8B.2@-2820.9,-4604.78 -2820.9,-4646.78 -2814.67,-4653.01 U2B.7@-2811.64,-4653.01
RECTC: R6C.2 R8C.2 U2C.7 | length 53.8
  Top Layer w10: R8C.2@-1721.11,-4604.78 -1721.11,-4646.78 -1714.88,-4653.01 U2C.7@-1711.86,-4653.01
RECTD: R6D.2 R8D.2 U2D.7 | length 53.8
  Top Layer w10: R8D.2@222.37,-4604.78 222.37,-4646.78 228.6,-4653.01 U2D.7@231.62,-4653.01
RECTE: R6E.2 R8E.2 U2E.7 | length 53.8
  Top Layer w10: R8E.2@2184.54,-4604.78 2184.54,-4646.78 2190.76,-4653.01 U2E.7@2193.79,-4653.01
RECTF: R6F.2 R8F.2 U2F.7 | length 53.8
  Top Layer w10: R8F.2@2997.25,-4604.79 2997.25,-4646.79 3003.48,-4653.02 U2F.7@3006.5,-4653.02
RECTG: R6G.2 R8G.2 U2G.7 | length 53.8
  Top Layer w10: R8G.2@3734,-4604.78 3734,-4646.78 3740.23,-4653.01 U2G.7@3743.25,-4653.01
RECTH: R6H.2 R8H.2 U2H.7 | length 53.8
  Top Layer w10: R8H.2@4403.47,-4604.78 4403.47,-4646.78 4409.7,-4653.01 U2H.7@4412.72,-4653.01
SMOOTHA: C4A.1 R7A.2 R10A.2 U2A.8 | length 152.7
  Top Layer w10: U2A.8@-3600.22,-4652.9 U2A.8@-3600.11,-4653.01
  Top Layer w12: R10A.2@-3602.89,-4603.78 -3602.89,-4650.23 U2A.8@-3600.22,-4652.9 ; U2A.8@-3600.11,-4653.01 U2A.8@-3599.12,-4653.01 -3548.12,-4653.01 -3526.1,-4630.99 C4A.1@-3526.1,-4611.78
SMOOTHB: C4B.1 R7B.2 R10B.2 U2B.8 | length 152.7
  Top Layer w10: U2B.8@-3031.25,-4652.9 U2B.8@-3031.13,-4653.01
  Top Layer w12: R10B.2@-3033.92,-4603.78 -3033.92,-4650.23 U2B.8@-3031.25,-4652.9 ; U2B.8@-3031.13,-4653.01 U2B.8@-3030.15,-4653.01 -2979.14,-4653.01 -2957.12,-4630.99 C4B.1@-2957.12,-4611.78
SMOOTHC: C4C.1 R7C.2 R10C.2 U2C.8 | length 152.7
  Top Layer w10: U2C.8@-1931.46,-4652.9 U2C.8@-1931.35,-4653.01
  Top Layer w12: R10C.2@-1934.13,-4603.78 -1934.13,-4650.23 U2C.8@-1931.46,-4652.9 ; U2C.8@-1931.35,-4653.01 U2C.8@-1930.36,-4653.01 -1879.36,-4653.01 -1857.34,-4630.99 C4C.1@-1857.34,-4611.78
SMOOTHD: C4D.1 R7D.2 R10D.2 U2D.8 | length 152.7
  Top Layer w10: U2D.8@12.02,-4652.9 U2D.8@12.13,-4653.01
  Top Layer w12: R10D.2@9.35,-4603.78 9.35,-4650.23 U2D.8@12.02,-4652.9 ; U2D.8@12.13,-4653.01 U2D.8@13.12,-4653.01 64.12,-4653.01 86.14,-4630.99 C4D.1@86.14,-4611.78
SMOOTHE: C4E.1 R7E.2 R10E.2 U2E.8 | length 152.7
  Top Layer w10: U2E.8@1974.18,-4652.9 U2E.8@1974.3,-4653.01
  Top Layer w12: R10E.2@1971.52,-4603.78 1971.52,-4650.23 U2E.8@1974.18,-4652.9 ; U2E.8@1974.3,-4653.01 U2E.8@1975.28,-4653.01 2026.29,-4653.01 2048.31,-4630.99 C4E.1@2048.31,-4611.78
SMOOTHF: C4F.1 R7F.2 R10F.2 U2F.8 | length 152.7
  Top Layer w10: U2F.8@2786.9,-4652.9 U2F.8@2787.01,-4653.02
  Top Layer w12: R10F.2@2784.23,-4603.79 2784.23,-4650.23 U2F.8@2786.9,-4652.9 ; U2F.8@2787.01,-4653.02 U2F.8@2788,-4653.02 2839,-4653.02 2861.02,-4631 C4F.1@2861.02,-4611.79
SMOOTHG: C4G.1 R7G.2 R10G.2 U2G.8 | length 152.7
  Top Layer w10: U2G.8@3523.65,-4652.9 U2G.8@3523.76,-4653.01
  Top Layer w12: R10G.2@3520.98,-4603.78 3520.98,-4650.23 U2G.8@3523.65,-4652.9 ; U2G.8@3523.76,-4653.01 U2G.8@3524.75,-4653.01 3575.75,-4653.01 3597.77,-4630.99 C4G.1@3597.77,-4611.78
SMOOTHH: C4H.1 R7H.2 R10H.2 U2H.8 | length 152.7
  Top Layer w10: U2H.8@4193.12,-4652.9 U2H.8@4193.24,-4653.01
  Top Layer w12: R10H.2@4190.45,-4603.78 4190.45,-4650.23 U2H.8@4193.12,-4652.9 ; U2H.8@4193.24,-4653.01 U2H.8@4194.22,-4653.01 4245.22,-4653.01 4267.24,-4630.99 C4H.1@4267.24,-4611.78
VCC_3V3: C1A.1 C1B.1 C1C.1 C1D.1 C1E.1 C1F.1 C1G.1 C1H.1 C2A.1 C2B.1 C2C.1 C2D.1 C2E.1 C2F.1 C2G.1 C2H.1 J1.3 J1.7 J1.11 J1.15 J1.19 J1.23 J1.27 J1.31 U1A.8 U1B.8 U1C.8 U1D.8 U1E.8 U1F.8 U1G.8 U1H.8 U2A.4 U2B.4 U2C.4 U2D.4 U2E.4 U2F.4 U2G.4 U2H.4 | length 58521.3
  Top Layer w10: v1@-3679.01,-5247.78 v1@-3676.89,-5247.78 ; v1(-3417.51,-4733.41) -3415.7,-4731.6 -3382.43,-4731.6 U2A.4@-3380.62,-4729.78 -3345.89,-4729.78 -3339.89,-4723.78 C2A.1@-3338.39,-4723.78 ; v1@-3110.03,-5247.78 v1@-3107.92,-5247.78 ; v1(-2848.54,-4733.41) -2846.73,-4731.59 -2813.46,-4731.59 U2B.4@-2811.64,-4729.78 -2776.92,-4729.78 -2770.92,-4723.78 C2B.1@-2769.42,-4723.78 ; v1@-2010.25,-5247.78 v1@-2008.13,-5247.78 ; v1(-1748.75,-4733.41) -1746.94,-4731.6 -1713.67,-4731.6 U2C.4@-1711.86,-4729.78 -1677.13,-4729.78 -1671.13,-4723.78 C2C.1@-1669.63,-4723.78 ; v1@-66.76,-5247.78 v1@-64.65,-5247.78 ; v1(194.73,-4733.41) 196.54,-4731.59 229.81,-4731.59 U2D.4@231.62,-4729.78 266.35,-4729.78 272.35,-4723.78 C2D.1@273.85,-4723.78 ; v1@1895.4,-5247.78 v1@1897.52,-5247.78 ; v1(2156.89,-4733.41) 2158.7,-4731.59 2191.98,-4731.59 U2E.4@2193.79,-4729.78 2228.52,-4729.78 2234.52,-4723.78 C2E.1@2236.02,-4723.78 ; v1@2708.11,-5247.79 v1@2710.23,-5247.79 ; v1(2969.61,-4733.41) 2971.42,-4731.6 3004.69,-4731.6 U2F.4@3006.5,-4729.79 3041.23,-4729.79 3047.23,-4723.79 C2F.1@3048.73,-4723.79 ; v1@3444.86,-5247.78 v1@3446.98,-5247.78 ; v1(3706.36,-4733.41) 3708.17,-4731.59 3741.44,-4731.59 U2G.4@3743.25,-4729.78 3777.98,-4729.78 3783.98,-4723.78 C2G.1@3785.48,-4723.78 ; v1@4114.34,-5247.78 v1@4116.45,-5247.78 ; v1(4375.83,-4733.41) 4377.64,-4731.6 4410.91,-4731.6 U2H.4@4412.72,-4729.78 4447.45,-4729.78 4453.45,-4723.78 C2H.1@4454.95,-4723.78
  Top Layer w12: v1(-3703.89,-4553.78) -3672.86,-4553.78 -3663.86,-4544.78 -3538.06,-4544.78 ccw(c-3538.06,-4482.31) -3475.59,-4482.31 -3475.59,-4220.31 v1(-3475.59,-4051.29) ; v1(-3134.92,-4553.78) -3103.89,-4553.78 -3094.89,-4544.78 -2969.09,-4544.78 ccw(c-2969.09,-4482.31) -2906.61,-4482.31 -2906.61,-4220.31 v1(-2906.61,-4051.29) ; v1(-2035.13,-4553.78) -2004.1,-4553.78 -1995.1,-4544.78 -1869.3,-4544.78 ccw(c-1869.3,-4482.31) -1806.83,-4482.31 -1806.83,-4220.31 v1(-1806.83,-4051.29) ; v1(-91.65,-4553.78) -60.62,-4553.78 -51.62,-4544.78 74.18,-4544.78 ccw(c74.18,-4482.31) 136.65,-4482.31 136.65,-4220.31 v1(136.65,-4051.29) ; v1(1870.52,-4553.78) 1901.54,-4553.78 1910.54,-4544.78 2036.35,-4544.78 ccw(c2036.35,-4482.31) 2098.82,-4482.31 2098.82,-4220.31 v1(2098.82,-4051.29) ; v1(2683.23,-4553.79) 2714.26,-4553.79 2723.26,-4544.79 2849.06,-4544.79 ccw(c2849.06,-4482.32) 2911.53,-4482.32 2911.53,-4220.32 v1(2911.53,-4051.3) ; v1(3419.98,-4553.78) 3451.01,-4553.78 3460.01,-4544.78 3585.81,-4544.78 ccw(c3585.81,-4482.31) 3648.28,-4482.31 3648.28,-4220.31 v1(3648.28,-4051.29) ; v1(4089.45,-4553.78) 4120.48,-4553.78 4129.48,-4544.78 4255.28,-4544.78 ccw(c4255.28,-4482.31) 4317.75,-4482.31 4317.75,-4220.31 v1(4317.75,-4051.29)
  Top Layer w50: v2@-27.36,-441.11 v2(20.75,-441.11) v2(59.41,-441.11) v2(138,-441.11) v2(216.74,-441.11) v2(295.48,-441.11) v2(374.22,-441.11) v2(452.96,-441.11) v2(531.7,-441.11) v2@608.75,-441.11 ; v2@610.75,-441.11 v2(655.75,-441.11)
  Bottom Layer w10: -269.25,-679.11 -196.2,-679.11 20.03,-462.88 20.03,-441.84 v2(20.75,-441.11) ; -269.25,-351.11 -46.25,-351.11 -28.25,-369.11 v2(-28.25,-440.22) ; -192.01,-826.38 -192.01,-797.88 138,-467.87 v2(138,-441.11) ; J1.3@59.12,-83.01 59.27,-83.16 v2@59.27,-441.11 ; 135.96,-826.03 135.96,-612.83 216.74,-532.05 216.74,-441.25 216.61,-441.11 216.67,-441.05 J1.11@216.61,-83.01 J1.11@216.61,-83.01 ; v2@137.86,-441.11 J1.7@137.86,-83.01 ; J1.15@295.35,-83.01 295.41,-83.08 295.41,-441.05 295.35,-441.11 295.48,-441.25 295.48,-536.8 480.35,-721.67 480.35,-823.19 ; v2@373.99,-441.35 374.22,-441.58 374.22,-515.58 562.75,-704.11 743.75,-704.11 824.59,-784.95 824.59,-827.44 ; 374.09,-371.11 J1.19@374.09,-83.01 ; v2(374.22,-441.11) 374.22,-373.65 ; J1.23@452.83,-83.01 452.83,-441.11 452.96,-441.25 452.96,-467.73 452.96,-493.32 595.75,-636.11 775.75,-636.11 869.75,-730.11 926.47,-730.11 ; v2@531.57,-441.11 J1.27@531.57,-83.01 ; v2(609.75,-440.11) 610.31,-439.56 J1.31@610.31,-83.01 ; v2(655.75,-441.11) 656.06,-440.81 656.06,-415.81 702.75,-369.11 925.05,-369.11
  Bottom Layer w12: v1(-3703.89,-4553.78) -3703.57,-4554.1 -3703.57,-4660.86 ; v1(-3679.04,-5247.81) -3703.57,-5223.28 -3703.57,-4660.86 ; v1@-3476.04,-4050.84 -3476.04,-3009.11 cw(c-816.14,-3011.01) -814.25,-351.11 -269.25,-351.11 ; v1(-3417.51,-4733.41) -3418.49,-4733.41 -3435.87,-4750.78 -3613.65,-4750.78 -3703.57,-4660.86 ; v1(-3134.92,-4553.78) -3134.6,-4554.1 -3134.6,-4660.86 ; v1(-3110.06,-5247.81) -3134.6,-5223.28 -3134.6,-4660.86 ; v1@-2907.06,-4051.29 -2907.06,-3194.11 cw(c-395.65,-3190.52) -399.25,-679.11 -269.25,-679.11 ; v1(-2848.54,-4733.41) -2849.52,-4733.41 -2866.9,-4750.78 -3044.67,-4750.78 -3134.6,-4660.86 ; v1(-2035.13,-4553.78) -2034.81,-4554.1 -2034.81,-4660.86 ; v1(-2010.28,-5247.81) -2034.81,-5223.28 -2034.81,-4660.86 ; v1@-1807.06,-4051.29 -1807.06,-3373.09 cw(c-552.18,-3357.02) -959.84,-2170.09 ccw(c-1402.46,-1043.34) -192.01,-1026.52 -192.01,-826.38 ; v1(-1748.75,-4733.41) -1749.73,-4733.41 -1767.11,-4750.78 -1944.89,-4750.78 -2034.81,-4660.86 ; v1(-91.65,-4553.78) -91.33,-4554.1 -91.33,-4660.86 ; v1(-66.79,-5247.81) -91.33,-5223.28 -91.33,-4660.86 ; v1(136.65,-4051.29) 136.65,-826.72 ; v1(194.73,-4733.41) 193.75,-4733.41 176.37,-4750.78 -1.4,-4750.78 -91.33,-4660.86 ; 480.35,-823.19 480.35,-1033.17 ccw(c1720.94,-1043.87) 1243.51,-2188.97 cw(c834.58,-3384.95) 2098.46,-3370.13 v1@2098.46,-4051.29 ; 824.59,-827.44 824.59,-944.5 ccw(c2055.93,-968.42) 1844.04,-2181.63 cw(c1673.77,-3407.64) 2911.53,-3403.53 v1(2911.53,-4051.3) ; 925.05,-369.11 1176.75,-369.11 cw(c1179.11,-3507.47) 4317.46,-3505.11 v1@4317.46,-4051.29 ; 926.47,-730.11 1057.76,-730.11 cw(c1060.36,-3317.72) 3647.96,-3315.11 v1@3647.96,-4051.29 ; v1(1870.52,-4553.78) 1870.83,-4554.1 1870.83,-4660.86 ; v1(1895.37,-5247.81) 1870.83,-5223.28 1870.83,-4660.86 ; v1(2156.89,-4733.41) 2155.91,-4733.41 2138.54,-4750.78 1960.76,-4750.78 1870.83,-4660.86 ; v1(2683.23,-4553.79) 2683.55,-4554.11 2683.55,-4660.86 ; v1(2708.08,-5247.82) 2683.55,-5223.28 2683.55,-4660.86 ; v1(2969.61,-4733.41) 2968.63,-4733.41 2951.25,-4750.79 2773.47,-4750.79 2683.55,-4660.86 ; v1(3419.98,-4553.78) 3420.3,-4554.1 3420.3,-4660.86 ; v1(3444.83,-5247.81) 3420.3,-5223.28 3420.3,-4660.86 ; v1(3706.36,-4733.41) 3705.38,-4733.41 3688,-4750.78 3510.22,-4750.78 3420.3,-4660.86 ; v1(4089.45,-4553.78) 4089.77,-4554.1 4089.77,-4660.86 ; v1(4114.31,-5247.81) 4089.77,-5223.28 4089.77,-4660.86 ; v1(4375.83,-4733.41) 4374.85,-4733.41 4357.47,-4750.78 4179.7,-4750.78 4089.77,-4660.86
  Bottom Layer w15: v1@-3476.04,-4050.84 v1(-3475.59,-4051.29)